# Altium PCB pyPhotometry.PcbDoc
Units mm, origin at the board's own origin, x right, y up, seen from the top; angles counter-clockwise.
Board outline 82.55 x 57.91 mm, 2 copper layers (Top Layer, Bottom Layer); 48 components, 31 nets, 140 pads, 36 vias.
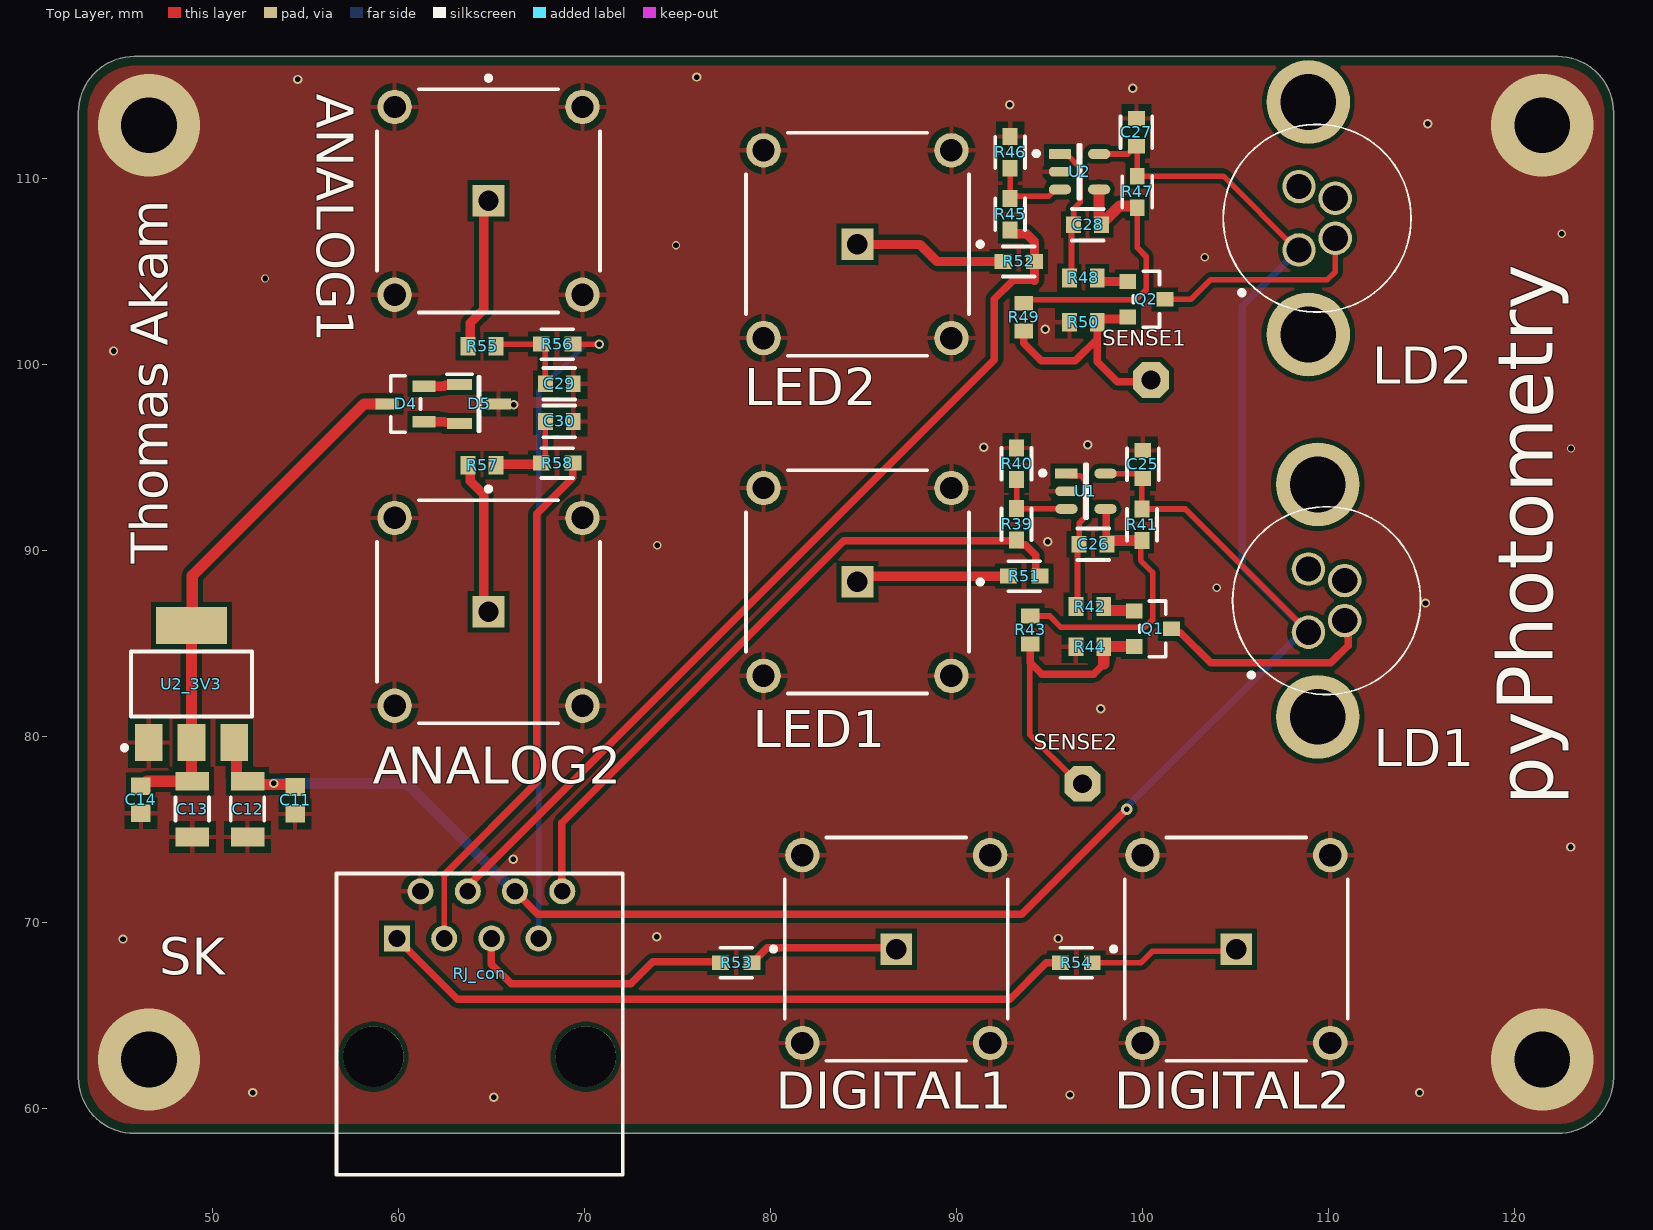
[diagram p0: Top Layer view]
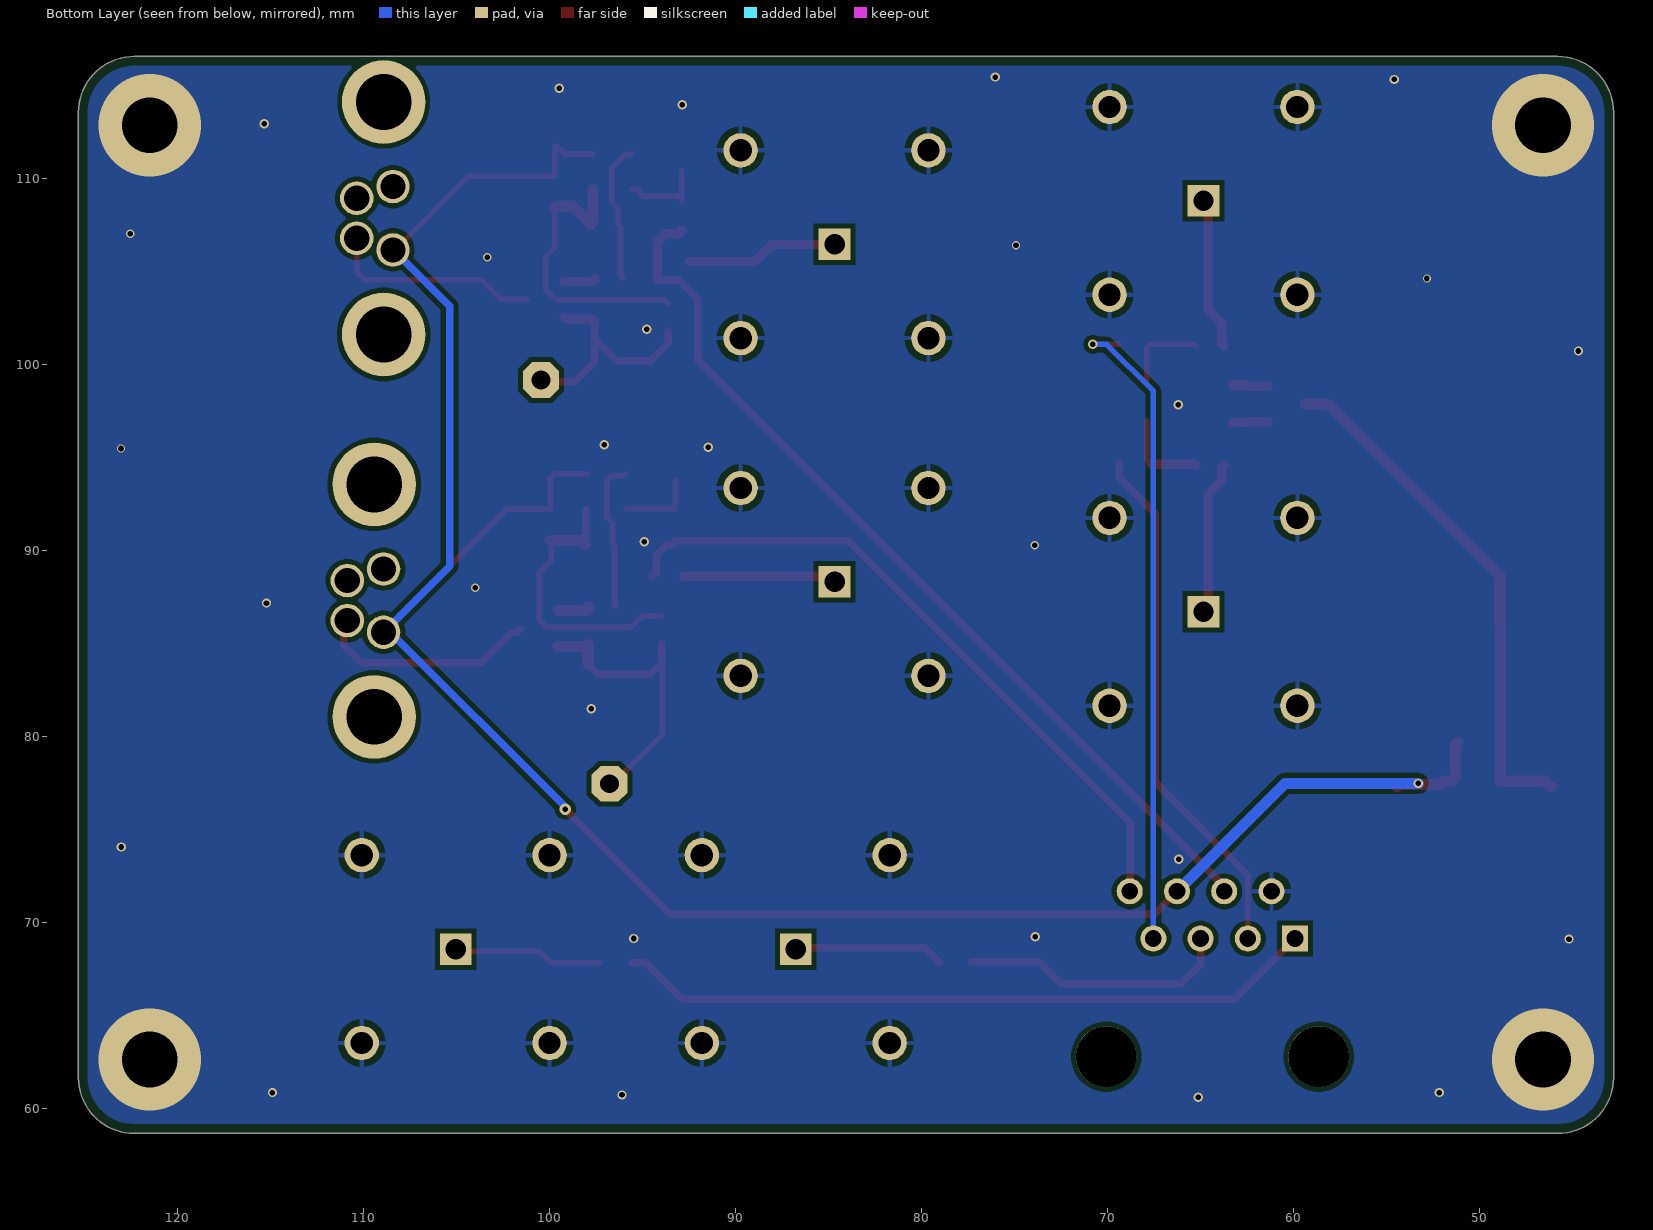
[diagram p1: Bottom Layer view, seen from below]
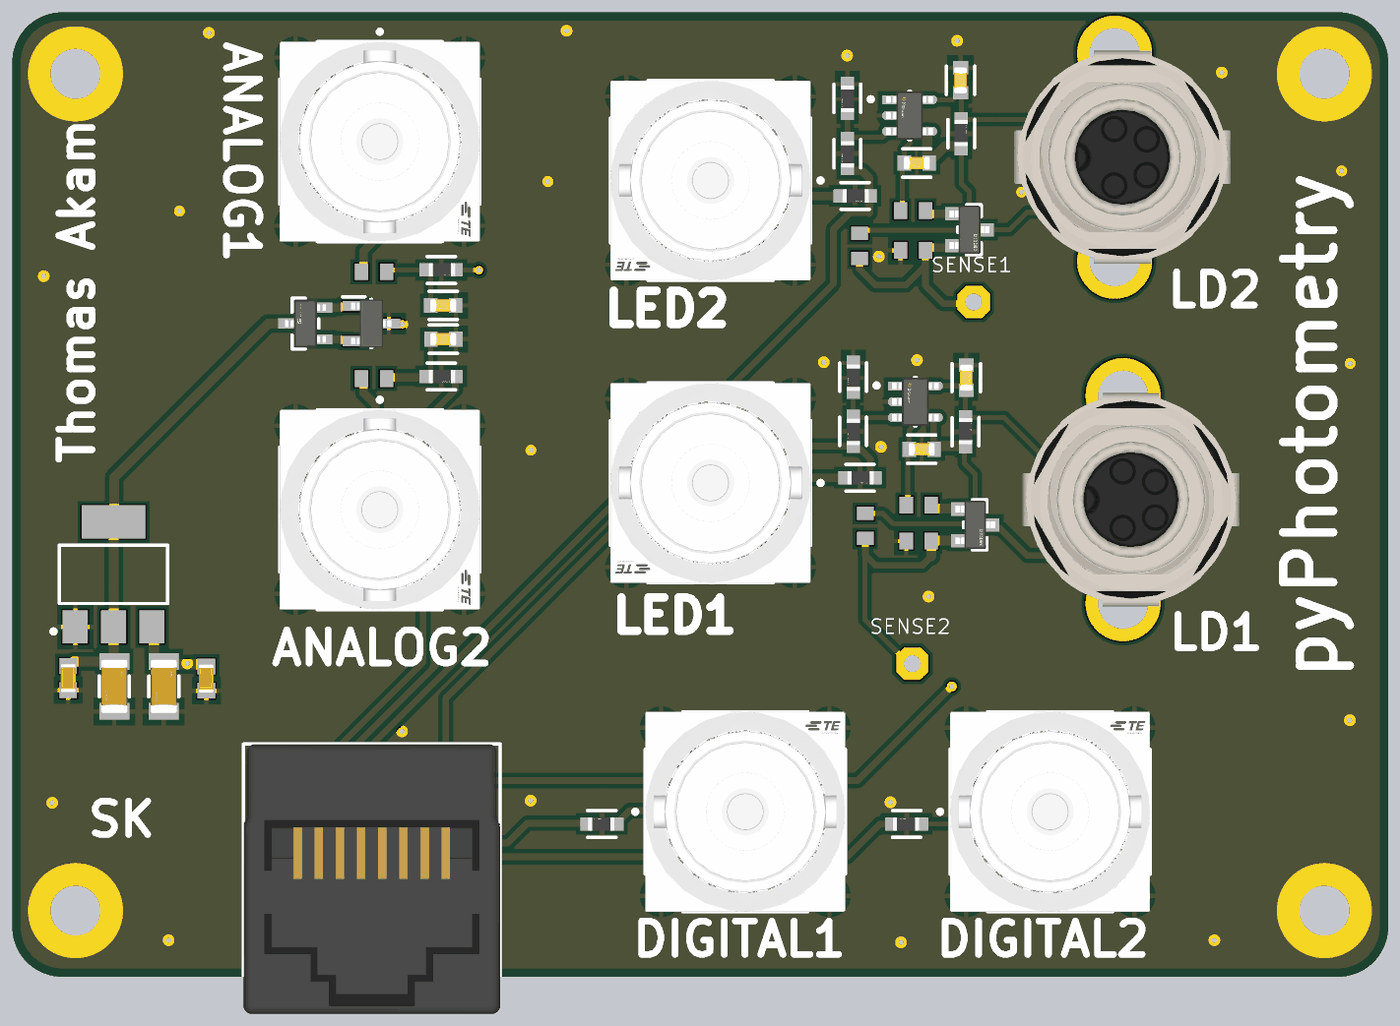
[diagram p2: 3D render of the assembled board from above, using the file's embedded part models]

## Layer stack, top to bottom
Top Solder: solder mask 0.0102, Solder Resist, Dk 3.5
Top Layer: signal copper 0.0356
Dielectric 1: dielectric 0.32, FR-4, Dk 4.8
Bottom Layer: signal copper 0.0356
Bottom Solder: solder mask 0.0102, Solder Resist, Dk 3.5

## Board outline
42.799,61.674 42.799,113.586 cw(c45.799,113.586) 45.799,116.586 122.349,116.586 cw(c122.349,113.586) 125.349,113.586 125.349,61.674 cw(c122.349,61.674) 122.349,58.674 45.799,58.674 cw(c45.799,61.674)

## Design rules (kind name [scope] priority, off if disabled: settings)
BoardOutlineClearance [All] p1: gap=0.254 ignorepadtopadclearanceinfootprint=FALSE except(0: Arc-SplitContinuation Track-SplitContinuation SMDPad-SplitContinuation THPad-SplitContinuation Via-SplitContinuation Fill-SplitContinuation Poly-SplitContinuation Region-SplitContinuation Text-SplitContinuation; 0.5: Poly-OutlineEdge Poly-CavityEdge Poly-CutoutEdge Poly-SplitBarrior)
Clearance [All] p1: gap=0.254 ignorepadtopadclearanceinfootprint=FALSE except(0.127: Arc-Arc Arc-Track Track-Track SMDPad-SMDPad; 0.2: Arc-SMDPad Track-SMDPad; 0.33: Arc-THPad Track-THPad; 0.5: THPad-THPad)
DiffPairsRouting [All] p1: maxlimit=0.203 minlimit=0.203 mostfreqgap=0.203 toplayer_minwidth=0.109 toplayer_maxwidth=0.19 toplayer_prefwidth=0.111 bottomlayer_minwidth=0.109 bottomlayer_maxwidth=0.19 bottomlayer_prefwidth=0.111 impedanceprofiledriven=TRUE maxuncoupledlength=12.7
MatchedLengths MatchedLengths_QSPI2 [InNetClass('QSPI')] p1: tolerance=7 checknetsindiffpair=FALSE checkdiffpairvsdiffpair=TRUE checkxsignals=TRUE checkothers=TRUE
PlaneClearance [All] p1: clearance=0.6
PlaneConnect [All] p1: pad.planeconnectstyle=Relief pad.reliefexpansion=0.508 pad.reliefentries=4 pad.reliefconductorwidth=0.254 pad.reliefairgap=0.254 via.planeconnectstyle=Direct via.reliefexpansion=0.508 via.reliefentries=4 via.reliefconductorwidth=0.254 via.reliefairgap=0.254
PolygonConnect [All] p1: thpad.connectstyle=Relief thpad.reliefconductorwidth=0.254 thpad.reliefentries=4 thpad.polygonreliefangle="90 Angle" thpad.airgapwidth=0.35 smdpad.connectstyle=Relief smdpad.reliefconductorwidth=0.254 smdpad.reliefentries=4 smdpad.polygonreliefangle="90 Angle" smdpad.airgapwidth=0.35 via.connectstyle=Direct via.reliefconductorwidth=0.254 via.reliefentries=4 via.polygonreliefangle="90 Angle" via.airgapwidth=0.254
RoutingVias [All] p1: holewidth=0.2 width=0.45 viastyle="Through Hole" minholewidth=0.2 minwidth=0.4 maxholewidth=3 maxwidth=5
SolderMaskExpansion [All] p1: expansion=0.102 istentingtop=FALSE
SupplyNets "Schematic Supply Nets_10" [InNet('GND')] p1: voltage=0.000
SupplyNets "Schematic Supply Nets_8" [InNet('Audio_POW')] p2: voltage=0.000
SupplyNets "Schematic Supply Nets_7" [InNet('MCU_5V')] p3: voltage=0.000
SupplyNets "Schematic Supply Nets_6" [InNet('+12V_motor')] p4: voltage=0.000
SupplyNets "Schematic Supply Nets_5" [InNet('+3V3')] p5: voltage=0.000
SupplyNets "Schematic Supply Nets_4" [InNet('+5V_CL')] p6: voltage=0.000
SupplyNets "Schematic Supply Nets_3" [InNet('MCU_3V3')] p7: voltage=0.000
SupplyNets "Schematic Supply Nets_2" [InNet('+12V')] p8: voltage=0.000
SupplyNets "Schematic Supply Nets_1" [InNet('+5V')] p9: voltage=0.000
SupplyNets "Schematic Supply Nets" [InNet('VCC')] p10: voltage=0.000
UnRoutedNet [All] p1: checkbadconnections=TRUE
Width [All] p1: maxlimit=5 minlimit=0.1 preferedwidth=0.2 minimp=50.000000 maximp=50.000000 favimp=50.000000
26 further rules are at their usual default settings.

## Components (designator, comment, footprint, x,y, rotation, side; value= is the part's Value field where it differs from the comment)
ANALOG1 "1-1337445-0" FP-1-1337445-0-MFG 64.849,108.821 r270 top
ANALOG2 "1-1337445-0" FP-1-1337445-0-MFG 64.849,86.723 r270 top
C11 "GRM188R71H104KA93D" CAPC1608X90X35ML10T15 54.445,76.58 r90 top
C12 "CC1206KKX5R8BB105" FP-CC1206-1_25-MFG 51.891,76.11 r270 top value="1 uF"
C13 "CC1206KKX5R8BB105" FP-CC1206-1_25-MFG 48.92,76.11 r270 top value="1 uF"
C14 "GRM188R71H104KA93D" CAPC1608X90X35ML10T15 46.159,76.61 r90 top
C25 "CC0603KRX7R9BB153" FP-CC0603-DA-MFG 100.037,94.649 r90 top value="15 nF"
C26 "CC0603KRX7R9BB153" FP-CC0603-DA-MFG 97.361,90.352 r0 top value="15 nF"
C27 "CC0603KRX7R9BB153" FP-CC0603-DA-MFG 99.692,112.505 r90 top value="15 nF"
C28 "CC0603KRX7R9BB153" FP-CC0603-DA-MFG 97.066,107.535 r0 top value="15 nF"
C29 "CC0603KRX7R9BB153" FP-CC0603-DA-MFG 68.655,98.988 r0 top value="15 nF"
C30 "CC0603KRX7R9BB153" FP-CC0603-DA-MFG 68.66,96.961 r0 top value="15 nF"
D4 "BAR43CFILM" FP-SOT23-3L-MFG 60.387,97.899 r180 top value=7pF
D5 "BAR43AFILM" SOT105P242X150-3N 64.341,97.899 r0 top
DIGITAL1 "1-1337445-0" FP-1-1337445-0-MFG 86.776,68.585 r0 top
DIGITAL2 "1-1337445-0" FP-1-1337445-0-MFG 105.064,68.585 r0 top
LD1 "T4041037041-000" T4041037041000 109.918,87.323 r270 top
LD2 "T4041037041-000" T4041037041000 109.41,107.886 r270 top
LED1 "1-1337445-0" FP-1-1337445-0-MFG 84.691,88.328 r180 top
LED2 "1-1337445-0" FP-1-1337445-0-MFG 84.691,106.489 r180 top
Q1 "DMG2302UK-7" FP-SOT23-MFG 100.574,85.809 r0 top
Q2 "DMG2302UK-7" FP-SOT23-MFG 100.229,103.531 r0 top
R39 "RT0603FRD07100RL" FP-RT0603-MFG 93.248,91.429 r270 top value=100Ω
R40 "RT0603FRD07100RL" FP-RT0603-MFG 93.248,94.683 r270 top value=100Ω
R41 "RT0603FRD07100RL" FP-RT0603-MFG 99.987,91.401 r90 top value=100Ω
R42 "RC0603JR-071KL" RESC1608X55X25ML10T15 97.184,87.005 r0 top
R43 "RC0603JR-071KL" RESC1608X55X25ML10T15 93.979,85.746 r270 top
R44 "RC0603JR-071KL" RESC1608X55X25ML10T15 97.184,84.838 r0 top
R45 "RT0603FRD07100RL" FP-RT0603-MFG 92.902,108.101 r270 top value=100Ω
R46 "RT0603FRD07100RL" FP-RT0603-MFG 92.902,111.428 r270 top value=100Ω
R47 "RT0603FRD07100RL" FP-RT0603-MFG 99.734,109.301 r90 top value=100Ω
R48 "RC0603JR-071KL" RESC1608X55X25ML10T15 96.838,104.674 r0 top
R49 "RC0603JR-071KL" RESC1608X55X25ML10T15 93.634,102.563 r270 top
R50 "RC0603JR-071KL" RESC1608X55X25ML10T15 96.838,102.293 r0 top
R51 "RT0603FRD07100RL" FP-RT0603-MFG 93.657,88.641 r0 top value=100Ω
R52 "RT0603FRD07100RL" FP-RT0603-MFG 93.363,105.563 r0 top value=100Ω
R53 "RT0603FRD07100RL" FP-RT0603-MFG 78.172,67.848 r180 top value=100Ω
R54 "RT0603FRD07100RL" FP-RT0603-MFG 96.46,67.849 r180 top value=100Ω
R55 "RC0603JR-071KL" RESC1608X55X25ML10T15 64.5,101.007 r0 top
R56 "RT0603FRD07100RL" FP-RT0603-MFG 68.539,101.115 r0 top value=100Ω
R57 "RC0603JR-071KL" RESC1608X55X25ML10T15 64.5,94.597 r0 top
R58 "RT0603FRD07100RL" FP-RT0603-MFG 68.539,94.724 r0 top value=100Ω
RJ_con "615008138021" 615008138021 64.371,64.551 r0 top
SENSE1 "" 1X01 100.482,99.191 r0 top
SENSE2 "" 1X01 96.799,77.474 r0 top
U1 "OPA197IDBVT" FP-DBV0005A-IPC_C 96.98,93.206 r0 top
U2 "OPA197IDBVT" FP-DBV0005A-IPC_C 96.634,110.389 r0 top
U2_3V3 "NCP1117ST33T3G" ONSC-SOT-223-4-318H-01_A_V 48.877,82.839 r90 top locked

## Footprints (in the part's own frame and the unit in brackets; to place one, negate y for a bottom-side part, rotate by r counter-clockwise, add the part's x,y. Pads: shape width x height; smd on the part's side, far side on the other; paste and mask are expansions set on the pad)
1X01 [mil] "1X01"
  oct 76x76 / inner round 70.21 / far side oct 76x76 hole 40: 1(0,0)
  body extent -35,-35 35,35, height 150
615008138021 [mm] "Modular Jack Vertical Plastic 8P8C"
  rect 1.4x1.4 hole 0.9: 1(-4.445,4.6)
  round 1.4 hole 0.9: 2(-3.175,7.14) 3(-1.905,4.6) 4(-0.635,7.14) 5(0.635,4.6) 6(1.905,7.14) 7(3.175,4.6) 8(4.445,7.14)
  round 3.25 hole 3.25 unplated: MH1(-5.715,-1.75) MH2(5.715,-1.75)
  silkscreen extent -7.7,-8.1 7.7,8.1, body extent -7.7,-8.1 7.7,8.1, height 16.5
CAPC1608X90X35ML10T15 [mm] "Chip Capacitor, 2-Leads, Body 1.7x0.9mm, IPC Low Density"
  rect 0.95x1.05 smd: 1(-0.725,0) 2(0.725,0)
  body extent -0.85,-0.45 0.85,0.45, height 0.9
FP-1-1337445-0-MFG [mm]
  rect 1.7x1.7 hole 1.1 paste-2539.97 mask+0: 1(0,0)
  round 1.85 hole 1.2 paste-2539.97 mask+0: 2(-5.05,5.05) 3(5.05,5.05) 4(-5.05,-5.05) 5(5.05,-5.05)
  silkscreen extent -6.72,-6 6,6, body extent -6.1,-6.1 6.1,6.1, height 0.25
FP-CC0603-DA-MFG [mm]
  rect 0.8x0.9 smd paste+0 mask+0: 1(-0.75,0) 2(0.75,0)
  silkscreen extent -0.85,-0.85 0.85,0.85, body extent -1.35,-0.75 1.35,0.75, height 0.25
FP-CC1206-1_25-MFG [mm]
  rect 1x1.8 smd paste+0 mask+0: 1(-1.5,0) 2(1.5,0)
  silkscreen extent -0.63,-0.9 0.63,0.9, body extent -2.2,-1.25 2.2,1.25, height 0.25
FP-DBV0005A-IPC_C [mm]
  rect 1.205x0.532 smd paste+0 mask+0: 1(-1.05,0.95)
  rrect100% 1.205x0.532 smd paste+0 mask+0: 2(-1.05,0) 3(-1.05,-0.95) 4(1.05,-0.95) 5(1.05,0.95)
  silkscreen extent -2.45,-1.45 0.05,1.45, body extent -1.75,-1.55 1.75,1.55, height 0.25
FP-RT0603-MFG [mm]
  rect 0.9x0.8 smd paste+0 mask+0: 1(-0.85,0) 2(0.85,0)
  silkscreen extent -0.85,-0.81 0.86,0.8, body extent -1.4,-0.55 1.4,0.55, height 0.25
FP-SOT23-3L-MFG [mm]
  rect 1.26x0.61 smd paste+0 mask+0: 1(-0.995,0.95) 2(-0.995,-0.95) 3(0.995,0)
  silkscreen extent -0.8,-1.52 0.8,1.52, body extent -1.73,-1.62 1.73,1.62, height 0.25
FP-SOT23-MFG [mm]
  rect 0.9x0.8 smd paste+0 mask+0: 1(-1,0.95) 2(-1,-0.95) 3(1,0)
  silkscreen extent -0.7,-1.5 0.7,1.5, body extent -1.55,-1.6 1.55,1.6, height 0.25
ONSC-SOT-223-4-318H-01_A_V [mm] "SOT223, 4-Leads, Body 6.5x3.5mm, Pitch 2.3mm"
  rect 2x1.5 smd: 1(-3.15,2.3) 2(-3.15,0) 3(-3.15,-2.3)
  rect 2x3.8 smd: 4(3.15,0)
  silkscreen extent -3.55,-3.25 1.75,3.72, body extent -1.75,-3.25 1.75,3.25, height 1.8
RESC1608X55X25ML10T15 [mm] "Chip Resistor, 2-Leads, Body 1.60x0.80mm, IPC Low Density"
  rect 0.8x1 smd: 1(-0.75,0) 2(0.75,0)
  body extent -0.85,-0.45 0.85,0.45, height 0.55
SOT105P242X150-3N [mm]
  rect 1.35x0.6 smd: 1(-1.05,1.05) 2(-1.05,-1.05) 3(1.05,0)
  silkscreen extent -1.73,-1.45 0.03,1.6, body extent -1.21,-1.45 1.21,1.45, height 1.5
T4041037041000 [mm]
  round 1.8 hole 1.35: 1(1.7,-0.975) 2(1.075,0.975) 3(-1.7,-0.975) 4(-1.075,0.975)
  round 4.5 hole 3: MH1(-6.25,-0.475) MH2(6.25,-0.475)
  silkscreen extent -5.05,-5.05 5.05,5.05, body extent -6.4,-6.5 6.4,6.5, height 18.6

## Part data
ANALOG1 ANALOG2 DIGITAL1 DIGITAL2 LED1 LED2: library part CMP-03357-000006-1, "CONN BNC JACK STR 50 OHM PCB", Dielectric Material=PTFE, Frequency=4GHz, Insulation Resistance=5GR, Max Operating Temperature=165°C, Min Operating Temperature=-65°C, Operating Frequency="0 to 4Hz", Package Quantity=50, Body Material=Brass, Body Plating=Silver, Connector Type=BNC, Contact Material=Brass, Contact Plating=Silver, Depth=12mm, ELV=Compliant, Fastening Type=Bayonet, Gender=Female, Impedance=50R, Insulation Material=Polytetrafluoroethylene, Length=12mm, Material=Brass, Max Frequency=4GHz, Mount="Through Hole", Number of Positions=1, Orientation=Straight, Packaging=Bag, PCB Mount Retention=With, PCB Mounting Orientation=Vertical, PCB Thickness=0.126inch, Radiation Hardening=No, RoHS Compliant=Yes, Sealable="No (Without)", Series=BNC, Termination=Solder
C11 C14: library part CMP-2100-03643-1, "Chip Capacitor, 0.1 uF, +/- 10%, 50 V, -55 to 125 degC, 0603 (1608 Metric), RoHS, Tape and Reel (C77055)", Capacitance=100nF, Case Code (Imperial)=0603, Case Code (Metric)=1608, Dielectric=X7R, Dielectric Material=Ceramic, Insulation Resistance=10GR, Manufacturer=Murata, Max Operating Temperature=125degC, Min Operating Temperature=-55degC, Package Description="2-Pin Surface Mount Device, Body 1.6 x 0.8 mm", Package Quantity=1, Tolerance=10%, Voltage=50V, Case/Package=0603, Contact Plating=Tin, Datasheet URL=http://psearch.en.murata.com/capacitor/product/GRM188R71H104KA93%23.pdf, Datasheet Version=42675.0, Depth=0.8mm, Height=0.8mm, Lead Free=LeadFree, Length=1.6mm, Manufacturer URL=http://www.murata.com/, Material=Ceramic, Mount=SurfaceMount, Number of Pins=2, Package Reference=0603, Packaging=TapeandReel, Radiation Hardening=No, REACH SVHC=NoSVHC, RoHSCompliant=true, Termination=SMD/SMT, Thickness=0.035inch, Voltage Rating=50V, Voltage Rating (DC)=50V, Width=0.8mm
C12 C13: library part CMP-03422-001167-1, "10uF 25V X5R ±10% 1206 Multilayer Ceramic Capacitors MLCC - SMD/SMT ROHS (C128855)", Capacitance="1 uF", Manufacturer=Yageo, Package=CC1206-1.25, Temperature="-55°C to +125°C", Temperature Characteristic=X5R, Temperature Coefficient=15%, Temperature Range High=+125°C, Temperature Range Low=-55°C, Tolerance=0.1, Voltage Rating="25 V", Automotive=No, Automotive Grade=NA, Category=Cap, ComponentLink2Description=Datasheet, ComponentLink2URL=http://www.yageo.com/documents/recent/UPY-NP0X7R_HV_1KV-to-3KV_11.pdf, Device Class L1="Passive Components", Device Class L2=Capacitors, Device Class L3="Ceramic Capacitors", Digikey Description="CAP CER 1UF 25V X5R 1206", Footprint Url=http://www.yageo.com/exep/pages/download/literatures/UPY-C_GEN_24.pdf, Height=1.45mm, Lead Free=Yes, Manufacturer Part Number=CC1206KKX5R8BB105, Material=Ceramic, Mouser Description="Multilayer Ceramic Capacitors MLCC - SMD/SMT 1.0uF 25V X5R 10%", Octopart=https://octopart.com/cc1206kkx5r8bb105-yageo-20779154, RoHS=TRUE
C25 C26 C27 C28 C29 C30: library part CMP-03422-000725-1, "CAP CER 0.015UF 50V X7R 0603 (C107076)", Capacitance="15 nF", Manufacturer=YAGEO, Package=CC0603-DA, Temperature="-55°C to +125°C", Temperature Characteristic=X7R, Temperature Coefficient=15%, Temperature Range High=+125°C, Temperature Range Low=-55°C, Tolerance=0.1, Voltage="50 V", Automotive=No, Category=Cap, ComponentLink2Description=Datasheet, ComponentLink2URL=http://www.yageo.com/documents/recent/UPY-GPHC_X7R_6.3V-to-50V_18.pdf, Device Class L1="Passive Components", Device Class L2=Capacitors, Device Class L3="Ceramic Capacitors", Digikey Description="CAP CER 0.015UF 50V X7R 0603", Footprint Url=http://www.yageo.com/exep/pages/download/literatures/UPY-C_GEN_24.pdf, Height=0.9mm, Lead Free=Yes, Manufacturer Part Number=CC0603KRX7R9BB153, Material=Ceramic, Mouser Description="Multilayer Ceramic Capacitors MLCC - SMD/SMT 15nF 50V X7R 10%", Octopart=https://octopart.com/cc0603krx7r9bb153-yageo-42334129, RoHS=TRUE, Voltage Rating="50 V"
D4: library part CMP-12187-000004-1, "DIODE ARRAY SCHOTTKY 30V SOT23-3 (C69290)", Capacitance=7pF, Forward Current=0.1A, Manufacturer=STMicroelectronics, Max Junction Temp=+150°C, Max Repetitive Reverse Voltage=30V, Max Surge Forward Current=0.75A, Package=SOT23-3L, Peak Reverse Current=0.5uA, Temperature="to +150°C", Automotive=No, Category=Diode, ComponentLink2Description=Datasheet, ComponentLink2URL=https://www.st.com/resource/en/datasheet/bar43.pdf, Device Class L1="Discrete Semiconductors", Device Class L2=Diodes, Device Class L3="Schottky Diodes", Digikey Description="DIODE ARRAY SCHOTTKY 30V SOT23-3", Height=1.5mm, Lead Free=Yes, Manufacturer Part Number=BAR43CFILM, Mouser Description="Schottky Diodes & Rectifiers 100mA 30 Volt", Octopart=https://octopart.com/bar43cfilm-stmicroelectronics-39683191, Reverse Voltage=30V, RoHS=TRUE, Standoff Height=0mm, Temperature Range High=+150°C
D5: "Schottky Diode with Dual Cathode", Manufacturer_Name=STMicroelectronics, Mouser Part Number=511-BAR43AFILM, Arrow Part Number=BAR43AFILM, Arrow Price/Stock=https://www.arrow.com/en/products/bar43afilm/stmicroelectronics?utm_currency=USD&region=europe, Datasheet Link=http://www.st.com/web/en/resource/technical/document/datasheet/CD00000764.pdf, Height=1.5mm, Manufacturer_Part_Number=BAR43AFILM, Mouser Price/Stock=https://www.mouser.co.uk/ProductDetail/STMicroelectronics/BAR43AFILM?qs=V1woAGgG1aNxI05DoB34wA%3D%3D
LD1 LD2: "Connector", Manufacturer_Name="TE Connectivity", Mouser Part Number=571-T4041037041-000, Arrow Part Number=T4041037041-000, Arrow Price/Stock=https://www.arrow.com/en/products/t4041037041-000/te-connectivity?utm_currency=USD&region=europe, Datasheet Link=https://www.te.com/commerce/DocumentDelivery/DDEController?Action=srchrtrv&DocNm=1-1773701-8_M8M12_CONNECTOR_SYSTEM&DocType=Catalog%20Section&DocLang=Japanese&PartCntxt=T4041037041-000&DocFormat=pdf, Height=15.25mm, Manufacturer_Part_Number=T4041037041-000, Mouser Price/Stock=https://www.mouser.co.uk/ProductDetail/TE-Connectivity/T4041037041-000?qs=1mbolxNpo8e0ryuUhGdttQ%3D%3D
Q1 Q2: library part CMP-12801-000001-1, "MOSFET N-CH 20V 2.8A SOT23", Continuous Drain Current=2.8A, Drain To Source Breakdown Voltage=20V, Drain To Source Resistance=61mΩ, Gate To Source Voltage=12V, Input Capacitace At Vds="130pF @ 10V", Manufacturer="Diodes Inc.", Max Forward Diode Voltage=1.2V, Max Junction Temp=+150°C, Package=SOT23, Power Dissipation=0.66W, Pulse Drain Current=12A, Temperature="-55°C to +150°C", Temperature Range Low=-55°C, Typ Forward Diode Voltage=0.7V, Automotive=Yes, Automotive Grade="Grade 0", Category=Trans, ComponentLink2Description=Datasheet, ComponentLink2URL=https://www.diodes.com/assets/Datasheets/DMG2302UK.pdf, Depletion Mode=False, Device Class L1="Discrete Semiconductors", Device Class L2=Transistors, Device Class L3=MOSFETs, Digikey Description="MOSFET N-CH 20V 2.8A SOT23", Drain To Source Voltage=20V, Footprint Url=https://www.diodes.com/assets/Package-Files/SOT23.pdf, Gate Charge At Vgs="2.8nC @ 10V", Height=1.1mm, Lead Free=Yes, Manufacturer Part Number=DMG2302UK-7, Number Of Channels=1, Number Of N Channels=1, Octopart=https://octopart.com/dmg2302uk-7-diodes+inc.-73850182, Reverse Recovery Charge=0.5nC, Reverse Recovery Time=5.3ns, RoHS=TRUE, Rthja Max=192°C/W, Standoff Height=0.013mm, Temperature Range High=+150°C, Threshold Vgs Max=1V, Threshold Vgs Min=0.3V, Turn Off Delay Time=4.2ns, Turn On Delay Time=0.6ns
R39 R40 R41 R45 R46 R47 R51 R52 R53 R54 R56 R58: library part CMP-03412-020531-1, "RES SMD 100 OHM 1% 1/10W 0603 (C160603)s", Manufacturer=Yageo, Package=RT0603, Power Rating=0.1W, Resistance=100Ω, Temperature="-55°C to +155°C", Temperature Coefficient="25 ppm/°C", Temperature Range High=+155°C, Temperature Range Low=-55°C, Tolerance=0.01, Voltage Rating=75V, Automotive=No, Category=Res, ComponentLink2Description=Datasheet, ComponentLink2URL=http://www.yageo.com/documents/recent/PYu-RT_1-to-0.01_RoHS_L_9.pdf, Composition="Thin Film", Device Class L1="Passive Components", Device Class L2=Resistors, Device Class L3="Chip SMD Resistors", Digikey Description="RES SMD 100 OHM 1% 1/10W 0603", Footprint Url=http://www.yageo.com/exep/pages/download/literatures/PYu-R_Mount_10.pdf, Height=0.55mm, Ipc Land Pattern Name=RESC16080X45, Lead Free=Yes, Manufacturer Part Number=RT0603FRD07100RL, Mouser Description="High Precision-High Stability Chip Resistor Thin Film 0603 100Ohm 1% Paper T/R", Octopart=https://octopart.com/rt0603frd07100rl-yageo-71395265, RoHS=TRUE, Series=RT
R42 R43 R44 R48 R49 R50 R55: library part CMP-2000-05023-1, "Chip Resistor, 1 KOhm, +/- 5%, 0.063 W, -55 to 155 degC, 0603 (1608 Metric), RoHS, Tape and Reel (C14676)", Manufacturer=Yageo, Package Description="2-Pin Surface Mount Device, Body 1.6 x 0.8 mm", Package Reference=603, Power Rating=100mW, Resistance=1kohm, Resistance Tolerance=±5%, Resistor Case Style=0603[1608Metric], Resistor Element Type=ThickFilm, Temperature Coefficient=±100ppm/degC, Voltage Rating=50V, Automotive Qualification Standard=-, Datasheet URL=https://datasheet.ciiva.com/2452/pyu-rc0603-51-rohs-l-4-2452848.pdf, Datasheet Version="Rev. 4, 04/2009", Manufacturer URL=http://www.yageo.com/, MSL=MSL1-Unlimited, Packaging=CutTape, Product Range=RCSeries, SVHC=ToBeAdvised
R57: library part CMP-2000-05023-1, "Chip Resistor, 1 KOhm, +/- 5%, 0.063 W, -55 to 155 degC, 0603 (1608 Metric), RoHS, Tape and Reel (C14676)s", Manufacturer=Yageo, Package Description="2-Pin Surface Mount Device, Body 1.6 x 0.8 mm", Package Reference=603, Power Rating=100mW, Resistance=1kohm, Resistance Tolerance=±5%, Resistor Case Style=0603[1608Metric], Resistor Element Type=ThickFilm, Temperature Coefficient=±100ppm/degC, Voltage Rating=50V, Automotive Qualification Standard=-, Datasheet URL=https://datasheet.ciiva.com/2452/pyu-rc0603-51-rohs-l-4-2452848.pdf, Datasheet Version="Rev. 4, 04/2009", Manufacturer URL=http://www.yageo.com/, MSL=MSL1-Unlimited, Packaging=CutTape, Product Range=RCSeries, SVHC=ToBeAdvised
RJ_con: library part CMP-1502-01725-1, "Modular Jack WR-MJ, Plastic, Vertical Entry, THT, 8P8C (C86492)", Contact Resistance=20mOhm, Manufacturer="Wurth Elektronik", Operating Temperature=-40to85degC, Rated Current=1.5A, Withstanding Voltage=1000VAC, Working Voltage=120VAC, Compliance=Leadfree/RoHS, Datasheet URL=https://katalog.we-online.de/em/datasheet/615008138021.pdf, Entrance=Vertical, Manufacturer URL=http://www.we-online.de, Mounting Technology=THT, Package Reference=615008138021, Packaging=Tray, Part Number=615008138021, Pin Number=8P8C, Port=1x1, Publisher=WurthElektronik
SENSE1 SENSE2: library part 1X01, PackageName=1X01
U1 U2: library part CMP-04895-000163-1, "IC OPAMP GP 1 CIRCUIT SOT23-5", Case/Package=SOT-23-5, Input Bias Current=5pA, Input Offset Voltage (Vos)=25uV, Max Operating Temperature=125°C, Min Operating Temperature=-40°C, Operating Supply Current=1mA, Output Current per Channel=65mA, Bandwidth=10MHz, Gain Bandwidth Product=10MHz, Lead Free="Lead Free", Mount="Surface Mount", Number of Amplifiers=1, Number Of Channels=1, Number of Circuits=1, Number of Pins=5, Packaging="Cut Tape", REACH SVHC="No SVHC", RoHS Compliant=Yes, Slew Rate=20V/µs
U2_3V3: library part CMP-1679-00010-1, "Low-Dropout Positive Fixed Voltage Regulator, 1 A, 3.3 V Output Voltage, 0 to 125 degC, 4-Pin SOT-223 (318H-01), Pb-Free, Tape and Reel (C26537)", Case Code (Imperial)=0603, Case Code (Metric)=1608, Max Operating Temperature="155 degC", Min Operating Temperature="-55 degC", Package Quantity=5000, Power Rating="100 mW", Resistance="220 kohm", Tolerance=1%, Type (Resistor)="Thick Film", Voltage Rating="75 V", Case\Package=0603, ComponentLink1Description="Manufacturer URL", ComponentLink1URL=http://www.onsemi.com/, ComponentLink2Description=Datasheet, ComponentLink2URL=http://www.onsemi.com/pub_link/Collateral/NCP1117-D.PDF, DatasheetVersion="Rev. 27, 09/2014", Height="0.45 mm", Length="1.55 mm", Mount="Surface Mount", PackageDescription="4-Pin Small Outline Transistor, Body 6.5 x 3.5 mm, Pitch 2.3 mm", PackageReference=SOT-223-4-318H-01_A, Packaging="Tape and Reel", Radiation Hardening=No, REACH SVHC=Unknown, RoHSCompliant=true, Weight="7.1E-05 oz", Width="0.85 mm"

## Via types
v1: diameter 0.5, hole 0.3, Top Layer to Bottom Layer, 24 vias
v2: diameter 0.45, hole 0.3, Top Layer to Bottom Layer, 7 vias
v3: diameter 5.5, hole 3, Top Layer to Bottom Layer, 4 vias
v4: diameter 0.6, hole 0.3, Top Layer to Bottom Layer, 1 vias

## Nets (pads, with @x,y where several pads share a name; then routed paths per layer and width w, separated by ;. In a path a pad name is that pad's centre, name@x,y a point inside that pad or via, vN(x,y) a via of type N, cw(c..) or ccw(c..) an arc to the next point about the centre after c; other vN are vias at no path point)
+3V3: C13.1 C14.2 D4.3 U2_3V3.2 U2_3V3.4 | length 28.2
  Top Layer w0.6: C14.2 46.209,77.335 46.484,77.61 C13.1 48.877,77.653 U2_3V3.2 U2_3V3.4 ; U2_3V3.4@48.919,86.03 48.919,88.667 58.15,97.899 D4.3
+5V: C11.2 C12.1 C25.1 C27.1 LD1.1 LD2.1 R41.2 R47.2 RJ_con.6 U1.5 U2.5 U2_3V3.3 | length 123.1
  Top Layer w0.3: U2.5 99.226,111.339 99.642,111.755 C27.1 99.734,111.713 R47.2 104.368,110.151 108.333,106.186 LD2.1 ; U1.5 99.729,94.156 99.987,93.899 C25.1 99.987,93.849 R41.2 102.315,92.251 LD1.1
  Top Layer w0.4: RJ_con.6 67.506,70.461 93.522,70.461 v4(99.169,76.108)
  Top Layer w0.6: U2_3V3.3 51.291,79.575 51.291,77.81 51.491,77.61 C12.1 52.059,77.441 54.308,77.441 C11.2
  Bottom Layer w0.4: v4(99.169,76.108) 99.207,76.146 99.207,76.255 108.575,85.623 LD1.1 105.392,89.174 105.392,103.159 108.419,106.186 LD2.1
  Bottom Layer w0.6: v1(53.301,77.491) 60.475,77.491 RJ_con.6
\: R45.2 R52.2 RJ_con.4 | length 49.8
  Top Layer w0.4: RJ_con.4 63.736,71.959 92.057,100.28 92.057,103.544 93.072,104.559 94.213,104.559
  Top Layer w0.5: R45.2 92.902,107.201 93.052,107.051 93.782,107.051 94.213,106.619 R52.2 94.213,104.559
CLAMP1: C29.1 R55.2 R56.1 | length 4.7
  Top Layer w0.3: R55.2 65.358,101.115 R56.1 67.905,100.899 C29.1
CLAMP2: C30.1 R57.2 R58.1 | length 4.8
  Top Layer w0.3: R58.1 67.91,94.945 C30.1
  Top Layer w0.5: R57.2 65.313,94.66 67.625,94.66 R58.1
GND: ANALOG1.2 ANALOG1.3 ANALOG1.4 ANALOG1.5 ANALOG2.2 ANALOG2.3 ANALOG2.4 ANALOG2.5 C11.1 C12.2 C13.2 C14.1 C25.2 C27.2 C29.2 C30.2 D5.3 DIGITAL1.2 DIGITAL1.3 DIGITAL1.4 DIGITAL1.5 DIGITAL2.2 DIGITAL2.3 DIGITAL2.4 DIGITAL2.5 LED1.2 LED1.3 LED1.4 LED1.5 LED2.2 LED2.3 LED2.4 LED2.5 R40.1 R44.1 R46.1 R50.1 RJ_con.2 U1.2 U2.2 U2_3V3.1
  other v1: 65.133,60.614 96.121,60.741 52.179,60.868 114.917,60.868 45.194,69.123 95.485,69.154 73.896,69.25 66.181,73.409 123.045,74.076 97.771,81.505 115.236,87.191 94.916,90.493 91.487,95.573 97.075,95.7 66.2,97.85 44.686,100.746 94.789,101.923 115.363,112.972 92.884,113.988 99.488,114.877 54.592,115.351 76.055,115.478
  other v2: 104.013,88.011 73.914,90.297 123.063,95.504 52.832,104.648 103.358,105.793 74.93,106.426 122.555,107.061
  other v3: 46.591,62.646 121.521,62.646 46.591,112.892 121.521,112.892
NetANALOG1_1: ANALOG1.1 R55.1 | length 8.3
  Top Layer w0.5: R55.1 63.873,101.13 63.873,102.257 64.595,102.979 ANALOG1.1@64.595,108.948
NetANALOG2_1: ANALOG2.1 R57.1 | length 8.6
  Top Layer w0.5: R57.1 63.863,94.483 63.863,93.761 64.595,93.028 64.595,92.337 64.595,86.723 ANALOG2.1@64.595,86.342
NetC26_1: C26.1 R42.1 U1.1 | length 8.1
  Top Layer w0.3: U1.1 96.044,94.041 96.679,94.041 96.932,93.789 96.932,91.806 96.611,91.485 C26.1 96.522,90.263 96.522,87.094 R42.1
NetC26_2: C26.2 R41.1 R43.1 U1.4 | length 15.4
  Top Layer w0.3: R43.1 95.032,86.496 95.646,85.882 100.152,85.882 100.566,86.296 100.566,88.836 99.918,89.484 99.918,90.482 R41.1
  Top Layer w0.4: C26.2@98.071,90.393 U1.4@98.071,92.222
  Top Layer w0.6: C26.2 98.111,90.402 98.211,90.502 98.261,90.502 98.31,90.551 R41.1
NetC28_1: C28.1 R48.1 U2.1 | length 7.5
  Top Layer w0.3: U2.1 95.645,111.278 95.982,111.278 96.665,110.595 96.665,108.738 96.316,108.39 C28.1 96.202,107.421 96.202,104.788 R48.1
NetC28_2: C28.2 R47.1 R49.1 U2.4 | length 15.8
  Top Layer w0.3: R49.1 93.814,103.493 99.674,103.493 100.221,104.039 100.221,105.817 99.734,106.304 R47.1
  Top Layer w0.6: U2.4 97.685,107.717 C28.2@97.816,107.585 ; C28.2 C28.2@97.816,107.585 ; R47.1 99.734,108.453 99.634,108.553 98.784,108.553 C28.2@97.816,107.585
NetD4_1: D4.1 D5.2 | length 2
  Top Layer w0.5: D4.1 62.465,96.949 62.515,96.899 63.241,96.899 D5.2
NetD4_2: D4.2 D5.1 | length 2
  Top Layer w0.5: D4.2 62.465,98.849 62.515,98.899 63.241,98.899 D5.1
NetDIGITAL1_1: DIGITAL1.1 R53.1 | length 8.1
  Top Layer w0.4: R53.1 79.832,68.658 86.702,68.658 DIGITAL1.1
NetDIGITAL2_1: DIGITAL2.1 R54.1 | length 8.1
  Top Layer w0.3: R54.1 99.927,67.849 100.547,68.469 104.948,68.469 DIGITAL2.1
NetLD1_2: LD1.2 Q1.3 | length 12.1
  Top Layer w0.4: Q1.3 101.774,85.609 102.054,85.609 103.689,83.973 110.149,83.973 111.072,84.896 111.072,86.07 LD1.2
NetLD2_2: LD2.2 Q2.3 | length 11.6
  Top Layer w0.3: Q2.3 102.636,103.531 103.688,104.584 109.964,104.584 110.385,105.005 LD2.2
NetLED1_1: LED1.1 R51.1 | length 8.2
  Top Layer w0.5: LED1.1 85.004,88.641 R51.1
NetLED2_1: LED2.1 R52.1 | length 8.2
  Top Layer w0.5: LED2.1@84.705,106.475 88.052,106.475 88.965,105.563 R52.1
NetQ1_1: Q1.1 R42.2 | length 1.7
  Top Layer w0.6: R42.2 97.934,86.905 98.042,86.797 Q1.1@99.537,86.797
NetQ1_2: Q1.2 R43.2 R44.2 SENSE2.1 | length 15.7
  Top Layer w0.3: 93.962,84.256 93.962,80.107 SENSE2.1@96.374,77.695
  Top Layer w0.4: R43.2 93.979,84.256 93.979,83.993 94.597,83.375 97.391,83.375 97.934,83.918
  Top Layer w0.6: 97.934,83.918 97.934,84.959 98.034,84.859 Q1.2
NetQ2_1: Q2.1 R48.2 | length 1.7
  Top Layer w0.5: R48.2 97.588,104.631 97.738,104.481 Q2.1
NetQ2_2: Q2.2 R49.2 R50.2 SENSE1.1 | length 12.7
  Top Layer w0.4: R49.2 93.634,101.156 94.578,100.212 96.41,100.212 97.588,101.39 ; R50.2 97.588,100.167 98.661,99.095 SENSE1.1@100.439,99.095
  Top Layer w0.5: R50.2@97.588,102.318 97.738,102.468 99.116,102.468 Q2.2
NetR39_1: R39.1 R40.2 U1.3 | length 4.2
  Top Layer w0.3: R40.2 R39.1 93.271,92.256 U1.3
NetR45_1: R45.1 R46.2 U2.3 | length 4.5
  Top Layer w0.3: R45.1@92.902,108.824 R45.1@92.902,109.079 ; R46.2@92.902,110.451 R45.1@92.902,109.079 ; U2.3 95.31,109.439 95.203,109.332 95.203,109.298 94.984,109.079 R45.1@92.902,109.079
PA0_CMD: R54.2 RJ_con.1 | length 37.9
  Top Layer w0.4: RJ_con.1 63.201,65.875 92.871,65.875 94.845,67.849 R54.2
PA1_ADC1: R58.2 RJ_con.3 | length 28.4
  Top Layer w0.3: RJ_con.3 62.466,72.567
  Top Layer w0.4: 62.466,72.567 67.453,77.554 67.453,91.986 69.389,93.921 R58.2
PA5_I2S1_SCK: R39.2 R51.2 RJ_con.8 | length 37
  Top Layer w0.4: RJ_con.8@68.799,71.707 68.799,75.388 83.956,90.545 93.208,90.545 R39.2@93.235,90.517 ; R39.2 93.248,90.529 93.448,90.329 93.722,90.329 94.281,89.77 94.281,88.841 94.481,88.641 R51.2
PC0_ADC: R56.2 RJ_con.7 | length 35.1
  Top Layer w0.3: R56.2 69.395,101.109 70.791,101.109 v1(70.798,101.103)
  Bottom Layer w0.3: RJ_con.7 67.546,98.587 70.062,101.103 v1(70.798,101.103)
PC1_ADC: R53.2 RJ_con.5 | length 14.6
  Top Layer w0.4: RJ_con.5 65.006,67.776 66.072,66.71 72.499,66.71 73.684,67.895 R53.2@77.322,67.895
pads on no net: LD1.3 LD1.4 LD1.MH1 LD1.MH2 LD2.3 LD2.4 LD2.MH1 LD2.MH2 RJ_con.MH1 RJ_con.MH2

## Polygon pours and split planes (outlines as drawn)
GND on Top Layer "GND" (solid, pour order 0): 41.402,117.348 41.529,117.475 126.111,117.475 126.111,57.023 125.603,56.515 41.021,56.515
GND on Bottom Layer "GND" (solid, remove dead copper, pour order 1): 41.021,117.729 41.275,117.983 125.73,117.983 125.73,57.023 125.222,56.515 41.91,56.515

## Silkscreen, mask and mechanical layers (free items; w line width, h text height)
Top Overlay:
  text "Thomas Akam" at 47.606,89.3 h2 r90
  text "pyPhotometry" at 122.071,76.319 h3 r90
  text "SK" at 47.136,67.202 h2
Mechanical 1:
  the board outline again, w0.2